# Altium PCB NB2DSK01.PcbDoc (part 9 of 17)
Units mil, origin at the board's own origin, x right, y up, seen from the top; angles counter-clockwise.
Board outline 11815 x 6500.03 mil, 8 copper layers (Top Layer, MidLayer1, MidLayer2, GND, PWR, MidLayer3, MidLayer4, Bottom Layer), stack 74.62 mil thick; 798 components, 1002 nets, 3927 pads, 3182 vias.
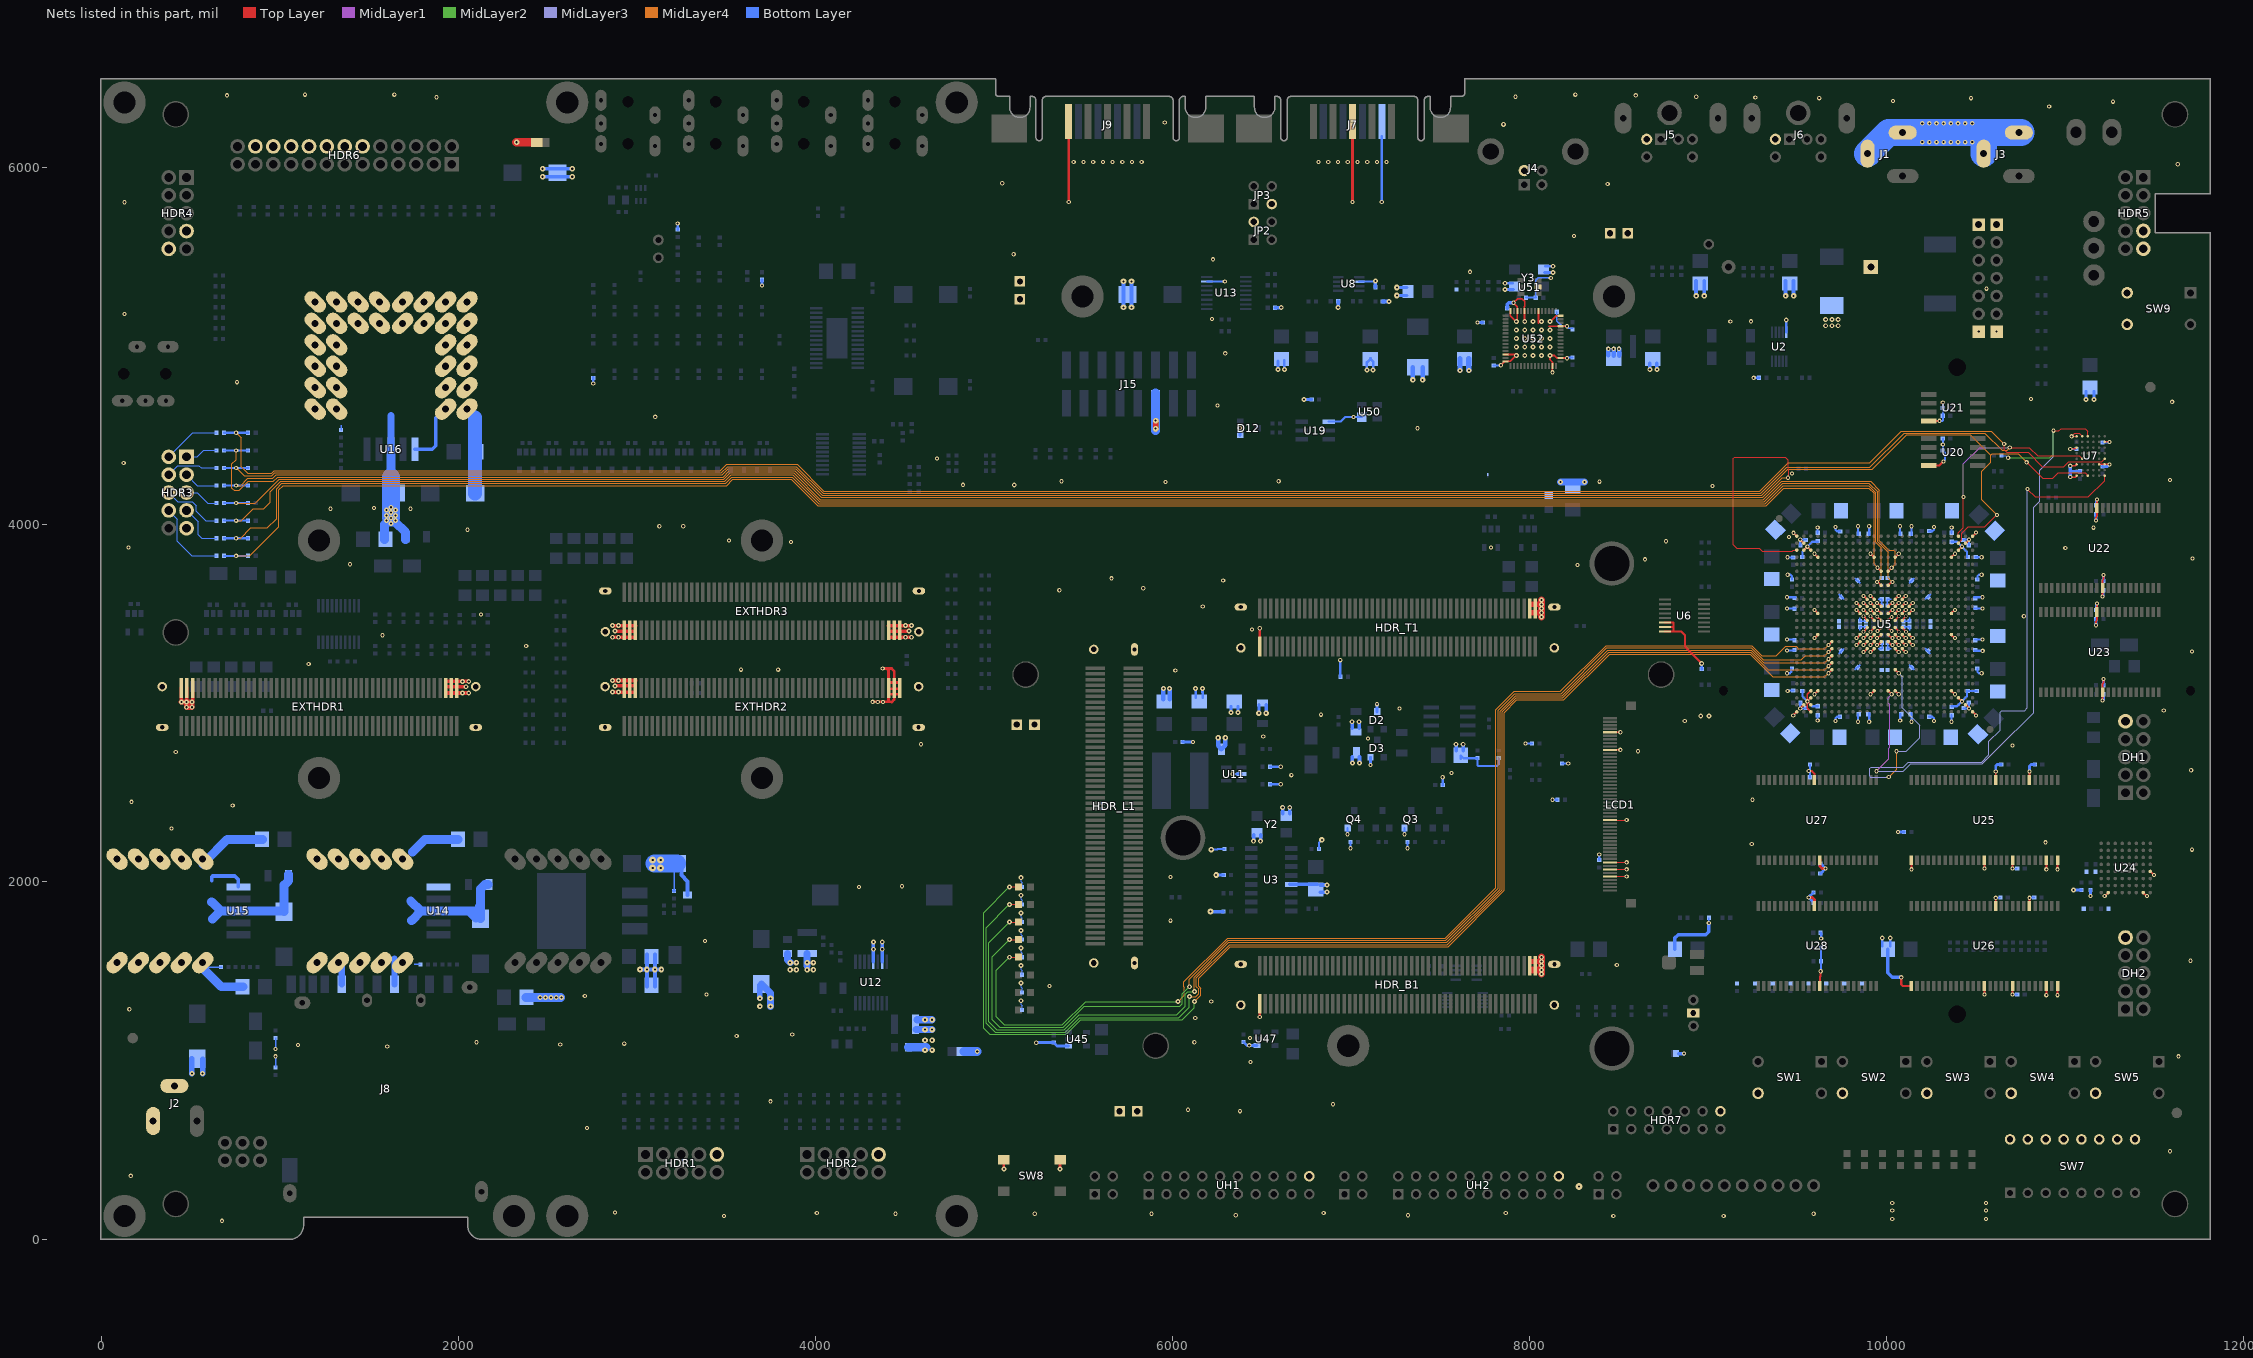
[diagram p15: the nets of this part, all layers, seen from the top]

## Via types
v1: diameter 23.62, hole 11.81, Top Layer to Bottom Layer, tented both sides, 1950 vias
v2: diameter 27.56, hole 11.81, Top Layer to Bottom Layer, tented both sides, 679 vias
v3: diameter 23.62, hole 11.81, Top Layer to Bottom Layer, 194 vias
v4: diameter 31.5, hole 11.81, Top Layer to Bottom Layer, tented both sides, 178 vias
v5: diameter 21.65, hole 11.81, Top Layer to Bottom Layer, tented both sides, 67 vias
v6: diameter 23.62, hole 11.81, Top Layer to Bottom Layer, tented bottom, 53 vias
v7: diameter 26, hole 11.81, Top Layer to Bottom Layer, tented both sides, 21 vias
v8: diameter 26, hole 11.81, Top Layer to Bottom Layer, 13 vias
v9: diameter 28, hole 11.81, Top Layer to Bottom Layer, 8 vias
v10: diameter 25.59, hole 11.81, Top Layer to Bottom Layer, tented both sides, 7 vias
v11: diameter 39.37, hole 11.81, Top Layer to Bottom Layer, tented both sides, 5 vias
v12: diameter 30, hole 11.81, Top Layer to Bottom Layer, 3 vias
v13: diameter 30, hole 11.81, Top Layer to Bottom Layer, tented both sides, 2 vias
v14: diameter 23, hole 11.81, Top Layer to Bottom Layer, tented both sides, 1 vias
v15: diameter 26.56, hole 11.81, Top Layer to Bottom Layer, tented both sides, 1 vias

## Nets (pads, with @x,y where several pads share a name; then routed paths per layer and width w, separated by ;. In a path a pad name is that pad's centre, name@x,y a point inside that pad or via, vN(x,y) a via of type N, cw(c..) or ccw(c..) an arc to the next point about the centre after c; other vN are vias at no path point) (continued)
GND: BT1.2 C1.2 C2.2 C3.2 C4.2 C10.2 C11.2 C12.2 C13.2 C14.2 C15.2 C18.2 C19.2 C20.2 C21.2 C22.2 C23.2 C24.2 C25.2 C26.2 C27.2 C28.2 C29.2 C30.2 C31.2 C32.2 C33.2 C34.2 C35.2 C36.2 C37.2 C38.2 C39.2 C40.2 C41.2 C42.2 C43.2 C44.2 C45.2 C46.2 C47.2 C48.2 C49.2 C50.2 C51.2 C52.2 C53.2 C54.2 C55.2 C56.2 C57.2 C58.2 C59.2 C60.2 C61.2 C62.2 C63.2 C64.2 C65.2 C66.2 C67.2 C68.2 C69.2 C70.2 C71.2 C72.2 C73.2 C74.2 C75.2 C76.2 C77.2 C78.2 C79.2 C80.2 C81.2 C82.2 C83.2 C84.2 C85.2 C86.2 C87.2 C88.2 C89.2 C90.2 C91.2 C92.2 C93.2 C94.2 C95.2 C96.2 C97.2 C98.2 C99.2 C100.2 C101.2 C102.2 C103.2 C104.2 C105.2 C106.2 C107.2 C108.2 C109.2 C110.2 C111.2 C112.2 C113.2 C114.2 C115.2 C116.2 C117.2 C118.2 C119.1 C120.2 C121.2 C122.2 C123.2 C124.2 C125.2 C126.2 C127.2 C128.2 C129.1 C130.2 C132.2 C133.2 C134.2 C135.2 C136.2 C137.2 C138.1 C139.1 C140.2 C141.2 C142.1 C143.2 C144.1 C146.1 C147.1 C148.1 C149.1 C150.2 C156.2 C157.2 C158.2 C159.2 C160.2 C161.2 C162.2 C163.2 C164.2 C165.2 C166.2 C167.2 C168.2 C169.2 C170.2 C172.2 C181.2 C189.2 C199.2 C200.1 C201.2 C202.1 C203.2 C204.2 C205.2 C206.2 C207.2 C208.2 C209.2 C210.2 C211.2 C212.2 C213.2 C214.2 C215.2 C216.2 C217.2 C218.2 C219.2 C220.2 C221.2 C222.2 C223.2 C224.2 C225.2 C226.2 C227.2 C228.2 C229.2 C230.2 C231.2 C232.2 C233.2 C234.2 C251.2 C253.2 C263.1 C264.1 C265.1 C266.2 C267.2 C268.2 C269.2 C270.2 C271.2 C272.1 C273.2 D1.1 D2.2 D3.2 D12.1 DH1.9 DH2.9 EXTHDR1.1 EXTHDR1.3 EXTHDR1.5 EXTHDR1.95 EXTHDR1.97 EXTHDR1.99 EXTHDR1.MH1 EXTHDR1.MH2 EXTHDR1.MH3 EXTHDR1.MH4 EXTHDR2.1 EXTHDR2.3 EXTHDR2.5 EXTHDR2.95 EXTHDR2.97 EXTHDR2.99 EXTHDR2.MH1 EXTHDR2.MH2 EXTHDR2.MH3 EXTHDR2.MH4 EXTHDR3.1 EXTHDR3.3 EXTHDR3.5 EXTHDR3.95 EXTHDR3.97 EXTHDR3.99 EXTHDR3.MH1 EXTHDR3.MH2 EXTHDR3.MH3 EXTHDR3.MH4 GP1.1 GP1.2 GP2.1 GP2.2 GP3.1 GP3.2 GP4.1 GP4.2 HDR1.9 HDR2.9 HDR3.9 HDR4.7 HDR4.10 HDR5.7 HDR5.9 HDR6.19 HDR6.20 HDR6.21 HDR6.22 HDR6.23 HDR6.24 HDR6.25 HDR7.14 HDR_B1.1 HDR_B1.98 HDR_B1.100 HDR_B1.MH1 HDR_B1.MH2 HDR_B1.MH3 HDR_B1.MH4 HDR_L1.MH1 HDR_L1.MH2 HDR_L1.MH3 HDR_L1.MH4 HDR_T1.1 HDR_T1.98 HDR_T1.100 HDR_T1.MH1 HDR_T1.MH2 HDR_T1.MH3 HDR_T1.MH4 J1.2 J1.3 J2.2 J2.3 J3.2 J3.3 J4.4 J5.3 J6.3 J7.3 J7.6 J8.3 J8.6 J9.5 J15.5 JP2.2 JP3.3 LCD1.5 LCD1.7 LCD1.9 LCD1.21 LCD1.41 LCD1.46 NT1.2 NT2.1 NT4.2 NT6.1 pad.0@88.68,1548.45 pad.0@88.68,2128.45 pad.0@208.68,1548.45 pad.0@208.68,2128.45 pad.0@328.68,1548.45 pad.0@328.68,2128.45 pad.0@448.68,1548.45 pad.0@448.68,2128.45 pad.0@568.68,1548.45 pad.0@568.68,2128.45 pad.0@1198.68,4648.45 pad.0@1198.68,4768.45 pad.0@1198.68,4888.45 pad.0@1198.68,5008.45 pad.0@1198.68,5128.45 pad.0@1198.68,5248.45 pad.0@1208.68,1548.45 pad.0@1208.68,2128.45 pad.0@1318.68,4648.45 pad.0@1318.68,4768.45 pad.0@1318.68,4888.45 pad.0@1318.68,5008.45 pad.0@1318.68,5128.45 pad.0@1318.68,5248.45 pad.0@1328.68,1548.45 pad.0@1328.68,2128.45 pad.0@1438.68,5128.45 pad.0@1438.68,5248.45 pad.0@1448.68,1548.45 pad.0@1448.68,2128.45 pad.0@1558.68,5128.45 pad.0@1558.68,5248.45 pad.0@1568.68,1548.45 pad.0@1568.68,2128.45 pad.0@1688.68,1548.45 pad.0@1688.68,2128.45 pad.0@1688.68,5128.45 pad.0@1688.68,5248.45 pad.0@1808.68,5128.45 pad.0@1808.68,5248.45 pad.0@1928.68,4648.45 pad.0@1928.68,4768.45 pad.0@1928.68,4888.45 pad.0@1928.68,5008.45 pad.0@1928.68,5128.45 pad.0@1928.68,5248.45 pad.0@2048.68,4648.45 pad.0@2048.68,4768.45 pad.0@2048.68,4888.45 pad.0@2048.68,5008.45 pad.0@2048.68,5128.45 pad.0@2048.68,5248.45 pad.0@8916.89,1266.02 pad.0@10514.96,5081.98 pad.0@10514.96,5681.95 pad.0@10614.96,5081.98 pad.0@10614.96,5681.95 Q3.2 Q4.2 R5.2 R19.2 R42.1 R44.1 R50.1 R51.1 R55.1 R58.1 R59.1 R62.2 R64.1 R65.1 R75.1 R78.2 R81.1 R82.1 R83.1 R92.1 R93.1 R94.1 R95.1 R96.1 R97.1 R98.1 R99.1 R100.1 R101.1 R102.1 R103.1 R104.1 R105.1 R106.1 R107.1 R312.2 R317.2 SW1.4 SW2.4 SW3.4 SW4.4 SW5.4 SW7.9 SW7.10 SW7.11 SW7.12 SW7.13 SW7.14 SW7.15 SW7.16 SW8.3 SW8.4 SW9.3 SW9.4 U2.5 U3.5 U5.A1 U5.A26 U5.AC3 U5.AC4 U5.AC12 U5.AC15 U5.AC23 U5.AD3 U5.AD24 U5.AE2 U5.AE3 U5.AE25 U5.AF1 U5.AF3 U5.AF26 U5.B2 U5.B25 U5.C2 U5.C3 U5.C24 U5.D4 U5.D12 U5.D15 U5.D23 U5.K11 U5.K12 U5.K15 U5.K16 U5.L10 U5.L11 U5.L12 U5.L13 U5.L14 U5.L15 U5.L16 U5.L17 U5.M4 U5.M10 U5.M11 U5.M12 U5.M13 U5.M14 U5.M15 U5.M16 U5.M17 U5.M23 U5.N11 U5.N12 U5.N13 U5.N14 U5.N15 U5.N16 U5.P11 U5.P12 U5.P13 U5.P14 U5.P15 U5.P16 U5.R4 U5.R10 U5.R11 U5.R12 U5.R13 U5.R14 U5.R15 U5.R16 U5.R17 U5.R23 U5.T10 U5.T11 U5.T12 U5.T13 U5.T14 U5.T15 U5.T16 U5.T17 U5.U11 U5.U12 U5.U15 U5.U16 U6.6 U6.7 U6.8 U7.A1 U7.A2 U7.B6 U7.C1 U7.F1 U7.F5 U7.F6 U7.H1 U8.2 U11.2 U12.13 U12.15 U13.15 U14.1 U14.3 U15.1 U15.3 U16.1 U16.3 U19.1 U20.4 U21.4 U22.12 U22.34 U23.12 U23.34 U24.E8 U24.H2 U24.H7 U25.6 U25.12 U25.28 U25.41 U25.46 U25.52 U25.54 U26.6 U26.12 U26.28 U26.41 U26.46 U26.52 U26.54 U27.12 U27.34 U28.12 U28.34 U45.1 U47.1 U50.1 U51.2 U52.6 U52.10 U52.12 U52.14 U52.26 U52.28 U52.41 U52.44 U52.53 U52.56 UH1.20 UH2.20 Y2.2 Y2.4 Y3.2 Y3.4 | length 31327.7
  Top Layer w5: LCD1.5@8448.82,2031.5 v1(8543.31,2031.5) ; LCD1.7@8448.82,2070.87 v1(8543.31,2070.87) ; LCD1.9@8448.82,2110.24 v1(8543.31,2110.24) ; LCD1.21@8448.82,2346.46 v1(8543.31,2346.46) ; U7.A1@11062.99,4496.06 v1(11035.43,4496.06) 11052.99,4513.62 11076.93,4513.62 U7.A2@11094.49,4496.06
  Top Layer w7.87: v1(7838.58,4893.7) v1(7838.58,4893.7) U52.28@7860.24,4915.35 ; U52.12@7931.1,5201.38 7931.1,5222.44 v1(7909.45,5244.09) 7933.07,5267.72 7956.69,5267.72 7972.44,5251.97 7972.44,5224.41 7970.47,5222.44 U52.10@7970.47,5197.78 U52.10@7970.47,5193.9 ; v1(8127.95,4854.33) U52.41@8127.95,4885.24 ; U52.53@8177.76,5112.2 v1(8208.68,5112.2) ; LCD1.41@8448.82,2740.16 v1(8507.87,2740.16) ; LCD1.46@8448.82,2838.58 v1(8507.87,2838.58) ; v1(9476.38,2933.07) U5.AF1@9496.06,2952.76 ; v1@9476.38,3956.7 v1(9477.68,3955.5) U5.A1@9496.06,3937.01 ; v1(9515.75,2972.44) U5.AE2@9535.43,2992.13 ; v1(9515.75,3917.32) U5.B2@9535.43,3897.64 ; U5.C2@9535.43,3858.27 v1(9555.12,3877.95) U5.C3@9574.8,3858.27 ; U5.AF3@9574.8,2952.76 9555.12,2972.44 v1(9555.12,3011.81) ; U5.AD3@9574.8,3031.5 v1(9555.12,3011.81) ; U5.AC3@9574.8,3070.87 9555.12,3051.18 v1(9555.12,3011.81) ; v1(9594.49,3051.18) U5.AC4@9614.17,3070.87 ; v1(9594.49,3366.14) U5.R4@9614.17,3385.83 ; v1(9594.49,3523.62) U5.M4@9614.17,3503.94 ; v1(9594.49,3838.58) U5.D4@9614.17,3818.9 ; v1(9830.71,3326.77) U5.T10@9850.39,3346.46 ; v1(9830.71,3366.14) U5.R10@9850.39,3385.83 ; v1(9830.71,3523.62) U5.M10@9850.39,3503.94 ; v1(9830.71,3562.99) U5.L10@9850.39,3543.31 ; v1(9870.08,3287.4) U5.U11@9889.76,3307.09 ; v1(9870.08,3326.77) U5.T11@9889.76,3346.46 ; v1(9870.08,3366.14) U5.R11@9889.76,3385.83 ; v5@9870.08,3402.76 U5.P11@9889.76,3425.2 ; v5@9870.08,3487.01 U5.N11@9889.76,3464.57 ; v1(9870.08,3523.62) U5.M11@9889.76,3503.94 ; v1(9870.08,3562.99) U5.L11@9889.76,3543.31 ; v1(9870.08,3602.36) U5.K11@9889.76,3582.68 ; v1(9909.45,3051.18) U5.AC12@9929.13,3070.87 ; v1(9909.45,3287.4) U5.U12@9929.13,3307.09 ; v1(9909.45,3326.77) U5.T12@9929.13,3346.46 ; v1(9909.45,3366.14) U5.R12@9929.13,3385.83 ; v5@9909.45,3403.15 U5.P12@9929.13,3425.2 ; v5@9909.45,3486.62 U5.N12@9929.13,3464.57 ; v1(9909.45,3523.62) U5.M12@9929.13,3503.94 ; v1(9909.45,3562.99) U5.L12@9929.13,3543.31 ; v1(9909.45,3602.36) U5.K12@9929.13,3582.68 ; v1(9909.45,3838.58) U5.D12@9929.13,3818.9 ; v5@9946.06,3562.99 U5.L13@9968.5,3543.31 ; v5@9946.46,3366.14 U5.R13@9968.5,3385.83 ; v5@9946.46,3523.62 U5.M13@9968.5,3503.94 ; v5(9946.85,3486.22) U5.N13@9968.5,3464.57 ; v5@9948.82,3326.77 U5.T13@9968.5,3346.46 ; v5(9948.82,3405.51) U5.P13@9968.5,3425.2 ; U5.T14@10007.87,3346.46 v5@10027.56,3326.77 ; U5.R14@10007.87,3385.83 v5@10029.92,3366.14 ; U5.P14@10007.87,3425.2 v5(10027.56,3405.51) ; U5.N14@10007.87,3464.57 v5(10027.56,3484.25) ; U5.M14@10007.87,3503.94 v5@10029.92,3523.62 ; U5.L14@10007.87,3543.31 v5@10030.32,3562.99 ; U5.AC15@10047.24,3070.87 v1(10066.93,3051.18) ; U5.U15@10047.24,3307.09 v1(10066.93,3287.4) ; U5.T15@10047.24,3346.46 v1(10066.93,3326.77) ; U5.R15@10047.24,3385.83 v1(10066.93,3366.14) ; U5.P15@10047.24,3425.2 v5@10066.93,3403.15 ; U5.N15@10047.24,3464.57 v5(10066.93,3488.19) ; U5.M15@10047.24,3503.94 v1(10066.93,3523.62) ; U5.L15@10047.24,3543.31 v1(10066.93,3562.99) ; U5.K15@10047.24,3582.68 v1(10066.93,3602.36) ; U5.D15@10047.24,3818.9 v1(10066.93,3838.58) ; U5.U16@10086.61,3307.09 v1(10106.3,3287.4) ; U5.T16@10086.61,3346.46 v1(10106.3,3326.77) ; U5.R16@10086.61,3385.83 v1(10106.3,3366.14) ; U5.P16@10086.61,3425.2 v5@10106.3,3405.51 ; U5.N16@10086.61,3464.57 v5@10106.3,3487.01 ; U5.M16@10086.61,3503.94 v1(10106.3,3523.62) ; U5.L16@10086.61,3543.31 v1(10106.3,3562.99) ; U5.K16@10086.61,3582.68 v1(10106.3,3602.36) ; U5.T17@10125.98,3346.46 v1(10145.67,3326.77) ; U5.R17@10125.98,3385.83 v1(10145.67,3366.14) ; U5.M17@10125.98,3503.94 v1(10145.67,3523.62) ; U5.L17@10125.98,3543.31 v1(10145.67,3562.99) ; U5.AC23@10362.2,3070.87 v1(10381.89,3051.18) ; U5.R23@10362.2,3385.83 v1(10381.89,3366.14) ; U5.M23@10362.2,3503.94 v1(10381.89,3523.62) ; U5.D23@10362.2,3818.9 v1(10381.89,3838.58) ; U5.AD24@10401.58,3031.5 v1(10421.26,3011.81) ; U5.C24@10401.58,3858.27 v1(10421.26,3877.95) ; U5.AE25@10440.95,2992.13 v1(10460.63,2972.44) ; U5.B25@10440.95,3897.64 v1(10460.63,3917.32) ; U5.AF26@10480.32,2952.76 v1(10500,2933.07) ; U5.A26@10480.32,3937.01 v1(10500,3956.7) ; v1(11027.56,4267.72) 11055.12,4267.72 U7.H1@11062.99,4275.59 ; v1(11027.56,4330.71) 11055.12,4330.71 U7.F1@11062.99,4338.58 ; v1(11027.56,4425.2) 11055.12,4425.2 U7.C1@11062.99,4433.07 ; U7.F5@11188.98,4338.58 U7.F6@11220.47,4338.58 v1(11248.03,4338.58) ; v1(11220.47,1921.08) U24.H2@11240.16,1940.77 ; U7.B6@11220.47,4464.57 v1(11248.03,4464.57) ; U24.H7@11437.01,1940.77 v1(11456.69,1921.08) ; U24.E8@11476.38,2058.88 v1(11496.06,2039.19)
  Top Layer w8: U52.28@7869.09,4915.35 7891.73,4915.35 v2@7925.2,4948.82 ; U52.14@7891.73,5193.9 7891.73,5171.26 7925.12,5137.87 v2@7925.2,5137.8 ; v2@8114.17,5137.8 8114.24,5137.87 8147.64,5171.26 U52.56@8170.28,5171.26
  Top Layer w9.84: U52.26@7861.61,4954.73 7865.35,4954.73 7925.19,4954.73 v2@7932.14,4954.73 ; v2@7931.1,5130.85 7931.1,5137.94 U52.12@7931.1,5197.78 U52.12@7931.1,5201.38 ; v2@7970.47,5130.85 7970.47,5137.94 U52.10@7970.47,5197.78 U52.10@7970.47,5201.38 ; 8049.21,5130.85 8049.21,5137.94 U52.6@8049.21,5197.78 U52.6@8049.21,5201.38 ; 8107.23,5112.21 8174.01,5112.21 U52.53@8177.76,5112.21 ; v1(10547.24,1370.08) U26.41@10547.25,1417.32 ; v1(10547.24,2074.8) U25.41@10547.25,2122.05 ; U26.12@10610.24,1866.14 v1(10610.24,1911.42) v1@10610.24,1915.36 ; U25.12@10610.24,2570.87 v1(10610.24,2618.11) ; v1(10704.72,1370.08) U26.46@10704.73,1417.32 ; v1(10704.72,2074.8) U25.46@10704.73,2122.05 ; U26.6@10799.21,1866.14 v1(10799.21,1911.42) v1@10799.21,1915.36 ; U25.6@10799.21,2570.87 v1(10799.21,2618.11) ; v1(11172.24,3437.99) 11172.24,3460.7 11177.17,3465.62 U23.34@11177.17,3511.81 v1(11177.17,3559.06) ; v1(11172.24,4024.61) 11172.24,4043.21 11177.17,4048.13 U22.34@11177.17,4094.49 v1(11177.17,4141.73) ; v1(11208.66,3015.75) U23.12@11208.66,3062.99 11208.66,3108.66 11213.58,3113.58 v1(11213.58,3136.81) ; v1(11208.66,3598.43) U22.12@11208.66,3645.67 11208.66,3690.2 11213.58,3695.13 v1(11213.58,3719.49)
  Top Layer w10: U52.41@8127.95,4892.72 8127.95,4910.69 8114.17,4924.47 8114.17,4948.82 8138.52,4948.82 8152.3,4935.04 U52.44@8170.28,4935.04 ; U52.44@8174.01,4935.19 v1@8206.95,4935.19
  Top Layer w11.81: v1(6488.19,1244.1) HDR_B1.1@6488.19,1318.9 ; HDR_T1.1@6488.19,3318.9 v1(6488.19,3421.26) ; v1(9562.99,2622.05) 9578.74,2622.05 9594.49,2606.3 U27.12@9594.49,2574.8 ; U28.34@9625.98,1417.32 9625.98,1467.98 9629.92,1471.92 v1(9629.92,1500.14) ; v1(10081,1466) 10081,1426 10089.68,1417.32 U26.28@10137.8,1417.32 ; v1(10137.8,2070.87) U25.28@10137.8,2122.05 ; U20.4@10234.25,4333.07 10295.07,4333.07 v1(10317,4355) ; U21.4@10234.25,4581.1 U21.4@10235.83,4582.68 ; v1(10893.7,1366.14) U26.52@10893.7,1417.32 ; v1(10893.7,2070.87) U25.52@10893.7,2122.05 ; v1(10956.69,1366.14) U26.54@10956.69,1417.32 ; v1(10956.69,2070.87) U25.54@10956.69,2122.05
  Top Layer w12: U6.8@8757.87,3401.93 8805.12,3401.93 ; U6.7@8757.87,3427.52 8803.15,3427.52 8805.12,3429.49 ; U6.6@8757.87,3453.11 8805.12,3453.11 8805.12,3429.49 ; v2(8963.58,3223.58) 8870.24,3316.93 8870.24,3381.69 8850,3401.93 8805.12,3401.93 ; v1(9555.12,3011.81) U5.AE3@9574.8,2992.13 ; U21.4@10235.83,4582.68 v1(10295.28,4582.68) ; 8805.12,3401.93 8805.12,3429.49
  Top Layer w15: v1(4320.6,3008.98) v1@4348.97,3008.98 ; v1(4349.37,3008.58) v1(4377.73,3008.58) 4403.34,3008.58 ; v1(4376.55,3195.34) 4399.15,3195.34 ; 4426.98,3008.58 4403.34,3008.58 ; 4427.77,3007.8 4440.95,3020.97 EXTHDR2.3@4440.95,3051.18 ; EXTHDR2.1@4472.44,3051.18 EXTHDR2.3@4440.95,3051.18 ; EXTHDR2.1@4472.44,3082.68 EXTHDR2.3@4440.95,3082.68 ; 4399.15,3195.34 4409.45,3185.04 4409.45,3118.11 EXTHDR2.5@4409.45,3086.61 EXTHDR2.5@4409.45,3082.68 ; 4399.15,3195.34 4426.71,3195.34 4440.95,3181.1 4440.95,3118.11 EXTHDR2.3@4440.95,3086.61 EXTHDR2.3@4440.95,3082.68 ; 4403.34,3008.58 4409.45,3014.69 EXTHDR2.5@4409.45,3051.18 ; EXTHDR2.5@4409.45,3051.18 EXTHDR2.5@4409.45,3082.68 ; EXTHDR2.5@4409.45,3051.18 EXTHDR2.3@4440.95,3051.18 ; EXTHDR2.5@4409.45,3082.68 EXTHDR2.3@4440.95,3082.68 ; EXTHDR2.3@4440.95,3051.18 EXTHDR2.3@4440.95,3082.68
  Top Layer w15.75: EXTHDR2.5@4409.45,3118.11 4440.95,3118.11 EXTHDR2.1@4472.44,3118.11 ; v2(5055.12,392.91) SW8.4@5055.12,444.49 SW8.4@5059.06,448.43 ; v2(5370.47,392.91) SW8.3@5370.47,444.49 ; J9.5@5418.28,6258.86 v1(5418.57,5807.92) ; v1(7007.89,5808.9) J7.3@7008,6259.84 ; v1(9562.99,1913.39) 9582.68,1913.39 9594.49,1901.58 U28.12@9594.49,1866.14 ; U27.34@9625.98,2122.05 9625.98,2086.62 9637.8,2074.8 v1(9657.48,2074.8)
  Top Layer w19.68: v2@448.82,3008.58 EXTHDR1.99@448.82,3086.61 ; v2@480.32,3010.08 EXTHDR1.97@480.31,3086.61 ; v2@511.81,3011.57 EXTHDR1.95@511.81,3086.61 ; EXTHDR1.5@1929.13,3123.45 1960.63,3123.45 1992.13,3123.45 v2(2023.68,3123.45) v2(2058.68,3123.45) ; EXTHDR1.5@1929.74,3058.45 1960.63,3058.45 1992.13,3058.45 v2(2023.68,3058.45) v2(2058.68,3058.45) ; EXTHDR1.5@1930.17,3093.45 1960.63,3093.45 1992.13,3093.45 v2(2043.68,3093.45) ; v2(2862.95,3063.43) v2(2897.95,3063.43) 2929.13,3063.43 2960.63,3063.43 EXTHDR2.95@2991.9,3063.43 ; v2(2862.95,3128.43) v2(2897.95,3128.43) 2929.13,3128.43 2960.63,3128.43 2992.13,3128.43 EXTHDR2.95@2992.5,3128.43 ; v2(2862.95,3370.51) v2(2897.95,3370.51) 2929.13,3370.51 2960.63,3370.51 EXTHDR3.5@2991.9,3370.51 ; v2(2862.95,3435.51) v2(2897.95,3435.51) 2929.13,3435.51 2960.63,3435.51 2992.13,3435.51 EXTHDR3.5@2992.5,3435.51 ; v2(2877.95,3098.43) 2929.13,3098.43 2960.63,3098.43 EXTHDR2.95@2991.47,3098.43 ; v2(2877.95,3405.51) 2929.13,3405.51 2960.63,3405.51 EXTHDR3.5@2991.47,3405.51 ; EXTHDR3.95@4409.07,3435.51 4409.45,3435.51 4440.95,3435.51 4472.44,3435.51 v2(4503.62,3435.51) v2(4538.62,3435.51) ; EXTHDR3.95@4409.68,3370.51 4440.95,3370.51 4472.44,3370.51 v2(4503.62,3370.51) v2(4538.62,3370.51) ; EXTHDR3.95@4410.11,3405.51 4440.95,3405.51 4472.44,3405.51 v2(4523.62,3405.51)
  Top Layer w29.53: HDR_B1.98@8007.87,1555.12 8031.5,1555.12 v2(8066.93,1555.12) ; HDR_T1.98@8007.87,3555.12 8031.5,3555.12 v2(8066.93,3555.12) ; 8011.81,3507.87 8031.5,3507.87 v2(8066.93,3507.87)
  Top Layer w30: v2(448.68,3008.45) v2(478.68,3008.45) ; v4(5905.51,4538.77) v4(5905.51,4583.68) ; v2(478.68,3008.45) v2(478.68,2978.45) v2(508.68,2978.45) v2(508.68,3008.45) v2(478.68,3008.45)
  Top Layer w39.37: 8011.81,1507.87 8031.5,1507.87 v2(8066.93,1507.87) ; v2(8066.93,1484.25) v2(8066.93,1507.87) ; v2(8066.93,1578.74) v2(8066.93,1555.12) v2(8066.93,1531.5) v2(8066.93,1507.87) ; v2(8066.93,3484.25) v2(8066.93,3507.87) v2(8066.93,3531.5) v2(8066.93,3555.12) v2(8066.93,3578.74)
  Top Layer w50: v4@2324.81,6142.82 v4(2326.58,6142.82) NT4.2@2409.4,6142.8
  MidLayer1 w30: v4(5905.51,4538.77) v4(5905.51,4583.68)
  MidLayer2 w30: v4(5905.51,4538.77) v4(5905.51,4583.68)
  MidLayer4 w30: v4(5905.51,4538.77) v4(5905.51,4583.68)
  MidLayer3 w30: v4(5905.51,4538.77) v4(5905.51,4583.68)
  Bottom Layer w5: HDR4.7@477.95,5644.88 HDR4.7@477.95,5645.67 ; v2(5151.97,1335.04) 5151.97,1311.76 5157.17,1306.56 R99.1@5157.17,1283.47 ; v2(5151.97,1433.47) 5151.97,1410.18 5157.17,1404.98 R98.1@5157.17,1381.89 ; v2(5151.97,1531.89) 5151.97,1508.61 5157.17,1503.41 R97.1@5157.17,1480.32 ; v2(5151.97,1630.32) 5151.97,1607.03 5157.17,1601.83 R96.1@5157.17,1578.74 ; v2(5151.97,1728.74) 5151.97,1705.46 5157.17,1700.26 R95.1@5157.17,1677.17 ; v2(5151.97,1827.17) 5151.97,1803.88 5157.17,1798.68 R94.1@5157.17,1775.59 ; v2(5151.97,1925.59) 5151.97,1902.31 5157.17,1897.11 R93.1@5157.17,1874.02 ; v2(5151.97,2024.02) 5151.97,2000.73 5157.17,1995.53 R92.1@5157.17,1972.44
  Bottom Layer w7.87: C269.2@8034.45,5272.46 8034.45,5370.49 8047.05,5383.09 v1(8118.5,5383.09) ; v1(9003.45,1770.36) R42.1@9003.45,1799.21 ; v1@9547.25,3877.95 v1(9555.12,3877.95) v1@9555.12,3885.83 ; 9732.28,3279.53 9745.23,3292.47 C32.2@9745.23,3294.14 9746.9,3294.14 9759.84,3307.09 ; 9732.28,3610.24 9745.23,3597.29 C29.2@9745.23,3595.62 9746.9,3595.62 9759.84,3582.68 ; C52.2@9736.22,2925.2 9738.46,2925.2 9740.16,2925.2 C52.2@9739.61,2924.65 ; 9821.96,3188.11 9835.78,3201.92 C27.2@9837.45,3201.92 9837.45,3203.59 9851.26,3217.4 ; 9822.83,3700.79 9835.78,3687.84 C31.2@9837.45,3687.84 9837.45,3686.17 9850.39,3673.23 ; 9849.41,3410.43 C85.2@9849.41,3429.14 ; C85.2@9849.41,3429.14 C107.2@9883.2,3429.45 ; 9849.41,3479.33 C105.2@9849.41,3460.63 C64.2@9883.2,3460.45 ; 9951.28,3306.1 C100.2@9972.44,3306.1 ; 9951.28,3583.66 C86.2@9972.44,3583.66 C92.2@9972.68,3548.93 ; C100.2@9971.46,3308.07 C100.2@9971.95,3307.58 ; C100.2@9973.44,3305.24 9973.45,3306.1 C62.2@9973.68,3339.97 ; C93.2@10003.68,3548.93 C94.2@10003.68,3583.42 ; C104.2@10003.94,3306.1 C104.2@10004.68,3306.1 ; C94.2@10003.94,3582.68 C94.2@10004.92,3581.69 ; C94.2@10003.94,3583.66 10025.1,3583.66 ; C104.2@10004.68,3305.49 C104.2@10004.68,3306.1 ; C110.2@10004.68,3339.97 C104.2@10004.68,3306.1 ; 10025.1,3306.1 C104.2@10004.68,3306.1 ; C63.2@10093.16,3429.45 C95.2@10127.95,3429.13 10127.95,3419.29 10127.95,3411.42 10125.98,3409.45 ; C96.2@10093.16,3460.45 C91.2@10127.95,3460.63 10127.95,3470.47 10127.95,3478.35 10125.98,3480.32 ; 10125.12,3217.4 10138.93,3203.59 C30.2@10138.93,3201.92 10140.6,3201.92 10153.54,3188.98 ; C95.2@10125.49,3428.64 C95.2@10125.98,3429.13 ; 10125.98,3673.23 10138.93,3686.17 C33.2@10138.93,3687.84 10140.6,3687.84 10153.54,3700.79 ; 10215.66,3307.96 10230.31,3293.31 C26.2@10231.15,3292.47 ; 10216.54,3582.68 10229.48,3595.62 C28.2@10231.15,3595.62 10231.15,3597.29 10246.6,3612.75 ; C26.2@10231.15,3294.14 C26.2@10231.15,3292.47 ; C26.2@10235.63,3299.21 C26.2@10236.22,3299.21 ; 10244.09,3279.53 C26.2@10231.15,3292.47
  Bottom Layer w8: pad.0@573.68,1523.45 R78.2@670.92,1523.45 R78.2@677.5,1523.45 ; R83.1@976.38,962.13 v1(976.38,1023.62) ; v1(976.38,1064.96) R82.1@976.38,1126.46 ; R81.1@1343.68,4531.03 1343.68,4558.45 ; 1753.68,1538.45 R75.1@1787.5,1538.45 ; R62.2@3208.68,1950.83 C137.2@3208.68,2098.45
  Bottom Layer w9.84: C272.1@8152.02,5193.1 8152.02,5141.98 8181.8,5112.2 v1(8208.68,5112.2) 8219.51,5101.38 C265.1@8240.16,5101.38 ; v1(10610.24,1911.42) C221.2@10635.82,1911.42 ; v1(10704.72,1370.08) C222.2@10731.3,1370.08 ; v1(10704.72,2074.8) C220.2@10728.35,2074.8 ; v1@10799.21,1913.39 C225.2@10825.79,1913.39
  Bottom Layer w10: v1(8208.68,4933.45) 8213.22,4937.99 C264.1@8240.16,4937.99
  Bottom Layer w11.81: v4@6220.47,2185.04 v4(6216.54,2181.1) 6248.84,2181.1 6252.78,2185.04 C13.2@6290.36,2185.04 ; v1(6336.61,2604.33) U11.2@6385.83,2604.33 ; C12.2@6819.88,2185.04 6819.88,2219.49 v4(6836.62,2236.22) ; v1(6980.64,2267.47) Q4.2@6980.64,2302.43 ; v1(6996.86,2188.73) R51.1@6996.86,2223.69 ; v1(7013,4604) U50.1@7060.24,4604 ; v1(7299.53,2267.47) Q3.2@7299.53,2302.43 ; v1(7315.75,2188.73) R50.1@7315.75,2223.69 ; C268.2@7799.21,4892.72 7837.6,4892.72 v1(7838.58,4893.7) ; v1(7977.32,2775.59) R44.1@8012.28,2775.59 ; v1(8127.95,2460.63) C118.2@8156.5,2460.63 ; C115.2@8181.1,2662.97 v1(8216.06,2662.97) ; C129.1@8389.76,2123.03 v1(8389.76,2153.54) ; C232.2@9569.88,2586.61 9569.88,2615.16 v1(9562.99,2622.05) 9569.88,2628.94 C228.2@9569.88,2657.48 ; v1@9630.91,1499.16 v1(9629.92,1500.14) 9630.91,1501.13 C229.2@9630.91,1556.18 C233.2@9630.91,1631.93 ; v1(10075,2905) 10075.39,2905.39 10075.39,2939.78 C71.2@10075.39,2939.96 ; v1(10295.28,4582.68) 10311.68,4582.68 10316,4587 10316,4609.41 C200.1@10313.96,4611.45 C201.2@10313.98,4654.74 v1(10313.98,4685.04) ; C202.1@10313.98,4484.25 v1(10313.98,4449.8) C199.2@10313.98,4417.32 10313.98,4417.16 10327,4404.14 10327,4365 v1(10317,4355) ; 11027.56,4299.21 11028.54,4300.2 ; v1(11027.56,4425.2) 11028.54,4424.21 C119.1@11062.99,4424.21 ; C208.2@11172.24,3523.62 11172.24,3554.13 v1(11177.17,3559.06) ; C207.2@11172.24,4110.24 11172.24,4132.87 11177.17,4137.8 v1(11177.17,4141.73) ; v1(11208.66,3598.43) 11213.58,3603.35 C204.2@11213.58,3633.86 ; C122.2@11208.66,4461.61 11245.08,4461.61 v1(11248.03,4464.57) ; v1@11246.06,4338.58 v1(11248.03,4338.58)
  Bottom Layer w12: U13.15@6192.59,5363.19 v1(6292.81,5363.19) ; U19.1@6874.27,4578.53 6942.53,4578.53 6968,4604 v1(7013,4604) ; R19.2@6939.43,3149.6 v1(6939.43,3242.47) ; U8.2@7045.11,5362.28 7133.41,5362.28 v2(7136.28,5365.15) ; C133.2@7614.06,2689.57 C133.2@7614.06,2708.66 7629.33,2693.39 R58.1@7708.54,2693.39 7708.54,2651.62 ; 7710.09,2650.08 7817.08,2650.08 7826.65,2659.65 R59.1@7826.65,2693.39 ; C270.2@7980.28,5272.46 C269.2@8034.45,5272.46 ; U2.5@9437.03,5078.18 v2(9437.03,5146.8) ; v1(9440.95,3169.29) 9456.65,3169.29 9465.16,3177.8 C40.2@9465.16,3195.16 ; v1(9440.95,3295.87) 9483.01,3295.87 C113.2@9483.27,3295.87 ; v1(9440.95,3357.68) 9483.01,3357.68 C72.2@9483.27,3357.68 ; v1(9440.95,3531.5) 9483.27,3531.5 C77.2@9488.19,3531.5 ; v1(9440.95,3594.49) 9483.27,3594.49 C109.2@9488.19,3594.49 ; v1(9444.88,3720.47) 9460.59,3720.47 9469.09,3711.97 C44.2@9469.09,3694.61 ; v1@9447.73,3071.69 C75.2@9476.76,3071.69 ; v1@9447.72,3818.08 C106.2@9476.76,3818.08 ; C47.2@9515.75,3003.94 9515.75,3003.35 v1(9515.75,2972.44) C50.2@9547.24,2972.44 ; C53.2@9515.75,3885.83 v1(9515.75,3917.32) 9546.65,3917.32 C45.2@9547.24,3917.32 ; C98.2@9527.56,3070.87 9527.56,3069.17 9527.56,3039.37 v1(9555.12,3011.81) 9582.68,2984.25 9612.87,2984.25 C81.2@9614.17,2984.25 ; C80.2@9527.56,3818.9 9527.56,3820.2 9527.56,3850.4 v1(9555.12,3877.95) 9582.68,3905.51 9613.01,3905.51 C78.2@9614.17,3905.51 ; v1(9613.03,2904.41) C99.2@9613.03,2933.45 ; C89.2@9613.03,3956.31 v1(9613.03,3985.35) ; v1(9712.6,2901.58) 9712.6,2917.28 9721.11,2925.79 C52.2@9738.46,2925.79 ; v1(9712.6,3988.19) 9712.6,3972.48 9721.11,3963.98 C41.2@9738.46,3963.98 ; v1(9838.58,2897.64) 9838.58,2939.78 C97.2@9838.58,2939.96 ; C112.2@9838.58,3944.88 9838.63,3950.16 v1(9838.98,3992.52) ; v1(9901.57,2897.64) 9901.58,2939.78 C76.2@9901.58,2944.88 ; C84.2@9901.58,3944.88 9901.58,3950.12 v1(9901.57,3992.13) ; C83.2@10074.8,3944.88 10074.8,3950.12 v1(10074.8,3992.13) ; v1(10137.8,2897.64) 10137.8,2939.78 C103.2@10137.8,2944.88 ; C111.2@10137.8,3944.88 10137.8,3950.12 v1(10137.8,3992.13) ; C42.2@10237.91,2925.79 10255.27,2925.79 10263.78,2917.28 v1(10263.78,2901.58) ; C38.2@10237.91,3963.98 10255.27,3963.98 10263.78,3972.48 v1(10263.78,3988.19) ; v1(10362.2,2897.64) C88.2@10362.21,2933.45 ; C70.2@10362.21,2984.25 10363.35,2984.25 10393.7,2984.25 v1(10421.26,3011.81) 10448.82,3039.37 10448.82,3069.78 C69.2@10448.82,3070.87 ; C79.2@10362.21,3905.51 10363.5,3905.51 10393.7,3905.51 v1(10421.26,3877.95) 10448.82,3850.4 10448.82,3820.12 C73.2@10448.82,3818.9 ; C87.2@10363.35,3956.31 v1(10363.35,3985.35) ; C43.2@10429.13,2972.44 10429.73,2972.44 v1(10460.63,2972.44) C48.2@10460.63,3003.94 ; C46.2@10429.13,3917.32 v1(10460.63,3917.32) 10460.63,3886.42 C49.2@10460.63,3885.83 ; C69.2@10453.78,3069.88 C108.2@10503.94,3069.88 ; C82.2@10488.19,3531.5 10496.35,3531.5 v1(10535.43,3531.5) ; C90.2@10488.19,3594.49 10495.35,3594.49 v1(10535.43,3594.49) ; C102.2@10493.11,3294.69 10495.35,3294.69 v1(10537.21,3294.69) ; C74.2@10493.68,3358.27 10495.35,3358.27 v1(10535.43,3358.27) ; C101.2@10498.68,3818.9 v1(10531.5,3818.9) ; C51.2@10507.28,3195.16 10507.28,3177.8 10515.79,3169.29 v1(10531.5,3169.29) ; C39.2@10507.28,3694.61 10507.28,3711.97 10515.79,3720.47 v1(10531.5,3720.47)
  Bottom Layer w15: C181.2@3228.68,5654.12 v1(3228.68,5688.45)
  Bottom Layer w15.75: v1(2755.91,4791.34) C172.2@2755.91,4821.85 C172.2@2755.91,4825.79 ; v1(3700.79,5341.34) C189.2@3700.79,5373.03 ; v1@5237.78,1100.78 C251.2@5334.73,1100.78 5353.43,1082.08 U45.1@5417.41,1082.08 ; C141.2@6055.12,2787.4 6057.58,2784.94 6059.06,2783.47 v1(6114.17,2783.47) ; C143.2@6129.92,3031.5 v2@6129.92,3083.45 ; v2(6168.68,3083.45) C143.2@6169.29,3031.5 ; v4(6244.09,2039.37) C14.2@6286.42,2039.37 ; v2(6326.77,2948.82) C132.2@6326.77,2984.25 ; v2(6366.14,2948.82) C132.2@6366.14,2984.25 ; D12.1@6378.66,4500.22 D12.1@6378.61,4504.6 v2(6378.66,4542.55) ; C253.2@6398.2,1103.8 6416.9,1085.1 v1(6429.69,1085.1) U47.1@6473,1085.1 ; R64.1@6546.77,2547.24 v1(6606.3,2547.24) ; R65.1@6546.77,2645.67 v1(6606.3,2645.67) ; v2(6590.61,4870.69) C123.2@6590.61,4917.94 ; v2(6626.05,4870.69) C123.2@6626.05,4921.87 ; v2@6733.08,4702 v2(6737.02,4702) C125.2@6779.34,4702 ; v2(7088.14,4866.76) 7088.14,4910.07 C124.2@7107.83,4929.75 ; C124.2@7107.83,4933.69 C124.2@7107.83,4929.75 ; v1(7108.27,2655.51) D3.2@7108.27,2698.82 ; v2(7123.57,4866.76) 7123.57,4914 C124.2@7107.83,4929.75 ; D2.2@7145.67,2952.76 D2.2@7145.67,2954.73 v1(7145.67,2996.06) ; J7.6@7171.46,6174.79 v1(7171.47,5808.9) ; C134.2@7512.8,2543.31 v1(7512.8,2586.61) ; v1(7708.66,5133.86) C267.2@7739.17,5133.86 ; v2(7861.93,5317.9) Y3.2@7909.17,5317.9 ; v2(7861.93,5353.34) Y3.2@7905.23,5353.34 ; Y3.4@8082.96,5412.9 v2(8130.2,5412.9) ; Y3.4@8086.89,5448.34 v2(8130.2,5448.34) ; C117.2@8963.58,3192.91 C117.2@8963.58,3194.31 ; v2(8963.58,3223.58) C117.2@8963.58,3194.31 ; C117.2@8964.96,3192.91 8965.35,3193.31 8964.18,3193.97 C117.2@8963.58,3194.31 ; v1(9254.55,4823.54) C11.2@9285.06,4823.54 ; C234.2@9589.57,1881.89 9589.57,1886.81 v1(9562.99,1913.39) 9562.99,1914.37 C230.2@9589.57,1940.95 ; C231.2@9626.97,2047.24 9629.92,2047.24 v1(9657.48,2074.8) 9629.92,2102.36 C227.2@9626.97,2102.36 ; C226.2@9629.62,1715.33 9632.57,1712.38 v1(9632.57,1683.84) ; C218.2@9974.58,1641.83 v2(9974.58,1686.83) ; C218.2@10019.58,1641.83 v2(10019.58,1686.83) ; v1(10063.1,2280.7) 10096.55,2280.7 C224.2@10097.55,2280.7 ; v1(10610.24,2618.11) 10610.24,2649.47 10618.25,2657.48 C219.2@10640.75,2657.48 ; v1(10799.21,2618.11) 10799.21,2649.47 10807.23,2657.48 C223.2@10829.72,2657.48 ; 11028.54,4300.2 C121.2@11082.68,4300.2 ; v2(11044.88,1955.53) C212.2@11090.55,1955.53 ; v2(11116,4703) C217.2@11116,4748 ; v1(11141.73,1921.08) C215.2@11141.73,1955.53 ; v2(11161,4703) C217.2@11161,4748 ; v1(11172.24,3437.99) C205.2@11172.24,3472.44 ; v1(11172.24,4024.61) C203.2@11172.24,4059.06 ; v1(11208.66,3015.75) 11213.58,3020.67 C206.2@11213.58,3051.18 ; C120.2@11208.66,4327.76 11235.24,4327.76 v1@11246.06,4338.58 ; C210.2@11213.58,3102.36 v1(11213.58,3136.81) ; C209.2@11213.58,3685.04 v1(11213.58,3719.49)
  Bottom Layer w17: v4(7256.38,5284.64) R317.2@7313.35,5284.64 ; v4(7256.38,5329.55) R317.2@7313.35,5329.55
  Bottom Layer w18: U12.15@4374.08,1553.55 v2(4374.08,1623.45) v2(4374.08,1663.05) ; v4(6483.45,2945.52) C139.1@6483.45,2994.77 ; v4(6524.43,2945.52) C139.1@6524.43,2994.77
  Bottom Layer w19.68: v4(6212.6,1834.65) R5.2@6282.91,1834.65 ; v2(6453.91,2228.46) Y2.2@6453.91,2263.89 ; v2(6493.28,2228.46) Y2.2@6493.28,2263.89 ; Y2.4@6616.95,2381.78 v2(6616.95,2417.21) ; U3.5@6655.51,1987.01 U3.5@6665.35,1987.01 6801.5,1987.01 C15.2@6810.24,1987.01 ; Y2.4@6656.32,2381.78 v2(6656.32,2417.21) ; C15.2@6828.7,1943.79 v2(6864.13,1943.79) ; C15.2@6828.7,1983.16 v2(6864.13,1983.16) ; 7005.92,2861.84 v2(7005.92,2897.28) ; v2(7007.72,2666.21) 7007.72,2701.64 ; 7045.29,2861.84 v2(7045.3,2897.28) ; v2(7047.09,2666.21) C130.2@7047.09,2701.64 ; C133.2@7588.48,2735.87 v2(7588.48,2771.3) ; C133.2@7627.85,2735.87 v2(7627.85,2771.3) ; v2(8672.83,4871.05) C10.2@8672.83,4906.48 ; v2(8712.2,4871.05) C10.2@8712.2,4906.48 ; v1(11027.56,4267.72) 11027.56,4299.21 v1@11027.56,4326.77
  Bottom Layer w20: 618.68,2008.45 618.68,2028.45 623.68,2033.45 748.68,2033.45 768.68,2013.45 U15.1@768.68,1972.31 ; U16.1@1757.54,4423.45 1853.68,4423.45 1873.68,4443.45 1873.68,4598.45 ; U12.13@4324.18,1553.45 v2(4324.18,1623.45) v2(4324.18,1662.95) ; C156.2@6574.48,5216.54 v2(6608.93,5216.54) ; v2(6927.83,5217.61) C127.2@6927.83,5252.06 ; R55.1@7136.28,5330.7 v2(7136.28,5365.15) ; C126.2@7177.41,5251.06 v2(7211.86,5251.06) ; C263.1@7874,5213.57 7874,5236 7882.09,5244.09 v1(7909.45,5244.09) ; C114.2@8813.31,1623 8813.31,1686.31 8832,1705 8987,1705 9003.45,1721.45 v1(9003.45,1770.36) ; 8836,1039 v1(8865,1039) ; C218.2@10005.89,1623 10005.89,1491.11 10031,1466 v1(10081,1466)
  Bottom Layer w22: v4(2471.99,5949.69) 2555.04,5949.69 v4(2638.13,5949.69) ; v4(2471.99,5994.61) 2555.04,5994.61 v4(2638.13,5994.61) ; v4(3017.28,1509.85) v4(3056.28,1509.85) ; C136.2@3056.28,1414.95 3056.28,1421.26 v4(3056.28,1509.85) ; C135.2@3056.28,1592.92 3056.28,1582.68 v4(3056.28,1509.85) ; C136.2@3101.2,1414.95 3101.2,1421.26 v4(3101.2,1509.85) ; C135.2@3101.2,1592.92 3101.2,1582.68 v4(3101.2,1509.85) ; v4(3137.28,1509.85) v4(3101.2,1509.85) ; C137.2@3224.6,2103.16 3249,2078.77 3249,2038 3283.56,2003.44 C138.1@3283.56,1927.18 ; v4(5725.12,5218) 5725.12,5290.81 v4(5725.12,5363.65) ; v4(5770.03,5218) 5770.03,5290.81 v4(5770.03,5363.65) ; v4(8932.79,5282.33) 8932.79,5351.22 C169.2@8932.79,5365.4 ; v4(8977.7,5282.33) 8977.7,5351.22 C169.2@8977.7,5365.4 ; v4(9433.72,5282.33) 9433.72,5351.22 C170.2@9433.72,5365.4 ; v4(9478.64,5282.33) 9478.64,5351.22 C170.2@9478.64,5365.4 ; v4(3056.28,1509.85) v4(3101.2,1509.85)
  Bottom Layer w23.62: v4(7345.88,4812) C271.2@7345.88,4882.87 ; v4(7401,4812) C271.2@7401,4882.87
  Bottom Layer w25: C116.2@5948.68,3023.45 v2(5948.68,3083.45) ; C116.2@5983.68,3023.45 v2(5983.68,3083.45) ; v4(6255.1,2808.03) 6255.1,2762.62 C144.1@6273.62,2744.1 6296.08,2766.55 v4(6296.08,2808.03) ; C273.2@8440.68,4951.08 v1(8440.68,4986.08) ; C273.2@8470.68,4946.08 v1(8470.68,4986.08) ; C273.2@8500.68,4946.08 v1(8500.68,4986.08)
  Bottom Layer w30: v2(507.93,926.74) 507.93,1010.84 C2.2@507.93,1011.74 ; v2(567.93,926.74) C2.2@567.93,1006.74 ; v4(3688.68,1348.45) C150.2@3688.68,1423.45 ; v2(7609.76,4864.63) C266.2@7609.76,4929.63 ; v2(7659.76,4864.63) C266.2@7659.76,4929.63
  Bottom Layer w35: J8.6@1347.22,1427.67 pad.0@1347.22,1547 ; J8.3@1642.5,1427.67 1642.5,1548.45 1642.5,1569.63
  Bottom Layer w39.37: C150.2@3696.85,1429.13 3748.68,1377.3 v4(3748.68,1348.45) v4(3748.68,1303.45) ; v2(8173.23,4240.16) 8240.16,4240.16 v2(8307.09,4240.16)
  Bottom Layer w40: U16.3@1623.68,4423.45 1623.68,4613.45 ; C148.1@3843.68,1599.08 3843.68,1563.45 v4(3858.68,1548.45) ; 3953.68,1529.8 v4(3953.68,1548.45) C149.1@3953.68,1599.4 ; C147.1@4563.68,1173.45 v4(4613.68,1173.45) v4(4653.68,1173.45) ; C147.1@4568.68,1228.45 v4(4613.68,1228.45) v4(4653.68,1228.45)
  Bottom Layer w50: pad.0@569.21,1517.09 672.85,1413.45 C163.2@790.69,1413.45 C163.2@794.63,1413.45 ; pad.0@569.21,2101.81 582.27,2114.87 705.85,2238.45 C162.2@900.69,2238.45 C162.2@904.63,2238.45 ; 618.68,1888.45 668.68,1838.45 ; 623.68,1793.45 668.68,1838.45 ; C164.2@1023.49,1838.45 U15.3@768.68,1838.45 668.68,1838.45 ; C164.2@1023.97,1834.38 1023.97,1982.63 1049.21,2007.87 C161.2@1049.21,2034.68 C161.2@1049.21,2040.79 ; C167.2@1587.74,3918.45 1587.74,4002.51 1603.68,4018.45 1608.68,4023.45 1618.68,4033.45 v2(1623.68,4038.45) 1628.68,4033.45 1638.68,4023.45 1643.68,4018.45 1704.63,3957.51 1704.63,3933.45 C165.2@1704.63,3918.45 ; 1623.68,4268.45 U16.3@1623.68,4423.45 ; 1733.68,1893.45 1788.68,1838.45 U14.3@1888.68,1838.45 2058.68,1838.45 ; 1738.68,1783.45 1793.68,1838.45 ; 1743.68,2168.45 1813.68,2238.45 C158.2@1998.03,2238.45 ; C160.2@2098.68,1798.45 2058.68,1838.45 ; C160.2@2118.68,1838.45 2058.68,1838.45 ; 2118.68,1863.45 2123.68,1858.45 ; C160.2@2123.96,1794.36 2123.68,1794.67 2123.68,1960.48 2149.79,1986.59 C157.2@2167.1,1986.6 ; C159.2@2377.74,1353.45 C159.2@2381.67,1353.45 v2(2458.68,1353.45) v2(2488.68,1353.45) v2(2518.68,1353.45) v2(2548.68,1353.45) v2@2573.68,1353.45 ; C146.1@4520.08,1074.45 C146.1@4522.05,1074.45 4613.68,1074.45 4619.68,1074.45 ; NT1.2@4830.8,1051.22 v2(4906.45,1051.22) ; v4@5905.51,4528.27 J15.5@5905.51,4738.98
  Bottom Layer w78.74: C3.2@2094.41,4176.89 2094.41,4409.45 2094.41,4602.44
  Bottom Layer w100: v2@1623.68,4041.78 1623.68,4053.45 v2(1623.68,4068.45) 1623.68,4083.45 v2(1623.68,4098.45) 1623.68,4178.18 1623.68,4268.45 ; 3098.97,2103.16 3133.68,2103.16 C137.2@3224.59,2103.18
  Bottom Layer w150: J1.3@9892.52,6078.74 10010.63,6196.85 J1.2@10089.37,6196.85 10198.68,6196.85 10238.68,6196.85 10278.68,6196.85 10318.68,6196.85 10358.68,6196.85 10398.68,6196.85 10438.68,6196.85 10478.68,6196.85 10542.91,6196.85 J3.2@10739.76,6196.85 J3.2@10752.08,6196.85 ; J3.3@10542.91,6078.74 10542.91,6143.45 10542.91,6196.08
  other v1: 677.17,102.36 10031,113 10555,113 3488.19,129.92 8468.5,129.92 9086.61,129.92 6354.33,133.86 7318.9,133.86 4448.82,141.73 5228.35,141.73 5881.89,141.73 9590.55,141.73 4007.87,145.67 6846.46,145.67 7866.14,145.67 2877.95,149.61 10031,159.54 10555,159.54 10031,202 10555,202 165.35,354.33 11586.61,492.13 2720.47,622.05 6377.95,716.54 6086.61,724.41 6898,755 3748.03,771.65 6437.01,992.13 11633.86,1023.62 1602.36,1078.74 1102.36,1086.61 2570.87,1090.55 2929.13,1094.49 5237,1100 2102.36,1102.36 6122.05,1102.36 6433.07,1125.98 3559.06,1137.8 3870.08,1145.67 6127.1,1237.6 157.48,1287.4 6216.54,1330.71 2708.66,1362.2 3389.76,1370.08 5311.02,1417.32 8488.19,1535.43 11700.79,1559.06 3381.89,1669.29 5988.19,1783.46 4244.09,1972.44 4484.25,1976.38 5988.19,2027.56 11708.66,2181.1 9244.09,2212.6 10889,2222 393.7,2299.21 736.22,2429.13 169.29,2448.82 9248.03,2460.63 6665.35,2598.43 7562.99,2610.24 11704.72,2625.98 417.32,2728.35 8606.3,2732.28 10704.72,2763.78 4590.55,2771.65 7094.49,2803.15 6507.87,2814.96 8868.5,2902.4 6830.71,2937.01 11551.18,2960.63 7271.65,2972.44 9445,3070 6015.75,3185.04 3582.68,3188.98 3791.34,3188.98 1162,3221 11708.66,3291.34 2380,3322 1575,3382 6444.88,3413.39 10767.72,3488.19 2127,3498 6169.29,3543.31 5366.14,3633.86 5836,3645 6283.46,3688.98 5657.48,3700.79 8267.72,3775.59 1393.7,3779.53 8645.67,3807.09 11712.6,3811.02 9444.5,3819 11000,3870.08 7784,3873 153.54,3874.02 3864,3904 8764.4,3908.6 3516,3912 9451.7,3932 2051.18,3972.44 11157.48,3984.25 3125.98,3992.13 3259.84,3992.13 1283.46,4090.55 1732.28,4090.55 1527.56,4094.49 9023.62,4218.11 4827.1,4224.3 5960.63,4240.16 8391,4242 5377.95,4244.09 6594.49,4244.09 11586.61,4251.97 9468.9,4288.3 125.98,4346.46 4681,4371 7372,4541 3103,4605 6251.97,4669.29 11598.43,4688.98 10807.09,4704.72 759.84,4799.21 6295.28,4960.63 9124,5139 9239,5140 6221,5153 129.92,5181.1 10559.06,5322.83 7665.35,5417.32 6226.3,5487.2 5110.24,5515.75 8248.03,5618.11 129.92,5807.09 8437.01,5909.45 5046.11,5913.39 11629.92,6019.69 5446.33,6032 5500.86,6032 5555.39,6032 5609.92,6032 5664.44,6032 5718.97,6032 5773.5,6032 5827.01,6032 6817.55,6032.98 6872.08,6032.98 6926.6,6032.98 6981.13,6032.98 7035.66,6032.98 7090.19,6032.98 7144.71,6032.98 7198.23,6032.98 10909.45,6342.52 11267.72,6370.08 10035.43,6374.02 9622.05,6389.76 10472.44,6389.76 9263.78,6393.7 1877.41,6394.92 7921.26,6397.64 8933.07,6397.64 704.72,6405.51 8594.49,6405.51 1141.73,6409.45 1641.73,6409.45 8255.91,6409.45
  other v2: 2578.68,1353.45 8958.4,2928.7 9003.94,2929.13 6128.68,3083.45 1623.68,4008.45 1598.68,4023.45 1648.68,4023.45 1598.68,4053.45 1648.68,4053.45 1598.68,4083.45 1648.68,4083.45 5113.68,4223.45 7925.19,4948.97 7972.44,4948.97 8019.68,4948.97 8066.93,4948.97 8114.17,4948.97 7925.19,4996.21 7972.44,4996.21 8019.68,4996.21 8066.93,4996.21 8114.17,4996.21 7925.19,5043.45 7972.44,5043.45 8019.68,5043.45 8066.93,5043.45 8114.17,5043.45 7925.19,5090.7 7972.44,5090.7 8019.68,5090.7 8066.93,5090.7 8114.17,5090.7 9658,5115.38 9693,5115.38 9728,5115.38 7925.19,5137.94 7972.44,5137.94 8019.68,5137.94 8066.93,5137.94 8114.17,5137.94 9658,5150.38 9693,5150.38 9728,5150.38 7853.68,6243.45
  other v4: 4613.68,1058.45 4653.68,1058.45 4613.68,1113.45 4653.68,1113.45 3688.68,1303.45 3858.68,1508.45 3893.68,1508.45 3953.68,1508.45 3988.68,1508.45 3893.68,1548.45 3988.68,1548.45
  other v5: 9944.88,3326.77 10031.5,3326.77 9945.68,3366.45 10031.5,3366.14 9870.08,3401.58 9909.45,3401.58 10066.93,3401.58 10106.69,3401.58 9870.08,3488.19 9909.45,3488.19 10106.3,3488.19 9944.88,3523.62 10031.5,3523.62 9944.88,3562.99 10031.5,3562.99
  other v6: 5956.69,6252.8
  other v7: 10198.68,6143.45 10238.68,6143.45 10278.68,6143.45 10318.68,6143.45 10358.68,6143.45 10398.68,6143.45 10438.68,6143.45 10478.68,6143.45 10198.68,6248.45 10238.68,6248.45 10278.68,6248.45 10318.68,6248.45 10358.68,6248.45 10398.68,6248.45 10438.68,6248.45 10478.68,6248.45
  other v11: 8275.59,295.28 3088.68,2078.45 3133.68,2078.45 3088.68,2123.45 3133.68,2123.45
HJTAG#.HARD.TCK: HDR3.3 R287.2 | length 193.3
  Bottom Layer w5: HDR3.3@477.95,4281.1 538.58,4220.47 R287.2@646.14,4220.47
HJTAG#.HARD.TDI: HDR3.1 R284.2 | length 183.2
  Bottom Layer w5: HDR3.1@477.95,4381.1 539.02,4381.1 575.24,4417.32 R284.2@646.14,4417.32
HJTAG#.HARD.TDO: HDR3.2 R285.2 | length 324
  Bottom Layer w5: HDR3.2@377.95,4381.1 512.6,4515.75 R285.2@646.14,4515.75
HJTAG#.HARD.TMS: HDR3.4 R286.2 | length 293.6
  Bottom Layer w5: HDR3.4@377.95,4281.1 427.56,4330.71 547.24,4330.71 559.06,4318.9 R286.2@646.14,4318.9
HJTAG#.SOFT.TCK: HDR3.7 R295.2 | length 274.1
  Bottom Layer w5: HDR3.7@477.95,4081.1 542.54,4016.52 542.54,3945.91 563.25,3925.2 R295.2@646.14,3925.2
HJTAG#.SOFT.TDI: HDR3.5 R292.2 | length 192.6
  Bottom Layer w5: HDR3.5@477.95,4181.1 538.23,4181.1 597.28,4122.05 R292.2@646.14,4122.05
HJTAG#.SOFT.TDO: HDR3.6 R293.2 | length 351.2
  Bottom Layer w5: HDR3.6@377.95,4181.1 429.13,4129.92 510.23,4129.92 533.54,4106.61 533.54,4076.26 586.18,4023.62 R293.2@646.14,4023.62
HJTAG#.SOFT.TMS: HDR3.8 R294.2 | length 446.4
  Bottom Layer w5: HDR3.8@377.95,4081.1 427,4032.06 427,3907.65 507.88,3826.77 R294.2@646.14,3826.77
HJTAG.HARD.TCK: R283.1 R287.1 U5.B24 U7.H3 | length 11565.3
  Top Layer w5: U5.B24@10401.58,3897.64 10421.26,3917.32 10421.26,3952.76 10456.69,3988.19 10549.19,3988.19 v1(10617,4056) ; v1(10783.46,4350.39) 10874.02,4259.84 10929.13,4259.84 10960.63,4291.34 11110.24,4291.34 U7.H3@11125.98,4275.59
  MidLayer4 w5: v1(755.91,4220.47) 781.7,4220.47 821.68,4260.45 960.68,4260.45 979.76,4279.53 3477.68,4279.53 3513.11,4314.96 3888.46,4314.96 4038.07,4165.36 9299.44,4165.36 9433.3,4299.21 9446.54,4312.45 9918.68,4312.45 10110.68,4504.45 10467.15,4504.45 10582.68,4388.93 ; v1(10617,4056) 10531.5,4141.5 10531.5,4299.21 10582.68,4350.39 10582.68,4388.93 ; v1(10783.46,4350.39) 10736.86,4397 10590.75,4397 10582.68,4388.93
  Bottom Layer w11.81: R287.1@688.5,4220.47 R283.1@823.31,4220.47
HJTAG.HARD.TDI: R280.1 R284.1 U5.C1 | length 10502.4
  Top Layer w5: v1(9446.9,4263.8) 9444.88,4365.58 9430.7,4379.76 9147.46,4379.76 9140,4372.3 9140,3889.24 9159.24,3870 9286.14,3870 9303.62,3852.52 9470.63,3852.52 9476.38,3858.27 U5.C1@9496.06,3858.27
  MidLayer4 w5: v1(755.91,4417.32) 755.91,4366.14 732.28,4342.52 732.28,4204.73 744.09,4192.91 772.56,4192.91 824.1,4244.45 964.68,4244.45 987.94,4267.72 3482.57,4267.72 3518.01,4303.15 3883.57,4303.15 4033.17,4153.54 9304.34,4153.54 9391.87,4241.07 9414.59,4263.8 v1(9446.9,4263.8)
  Bottom Layer w11.81: R284.1@688.5,4417.32 R280.1@823.31,4417.32
HJTAG.HARD.TDO: R281.1 R285.1 U7.E6 | length 11127.2
  Top Layer w5: v1(10657.48,4452.76) 10657.48,4421.26 10673.23,4405.51 10791.34,4405.51 10870.08,4326.77 10992.13,4326.77 11019.69,4354.33 11204.72,4354.33 U7.E6@11220.47,4370.08
  MidLayer4 w5: v1(755.91,4515.75) 783.46,4488.19 783.46,4326.77 820.78,4289.45 954.68,4289.45 968.38,4303.15 3467.9,4303.15 3503.33,4338.58 3898.25,4338.58 4047.85,4188.98 9289.66,4188.98 9448.14,4347.45 9904.68,4347.45 10081.68,4524.45 10585.78,4524.45 v1(10657.48,4452.76)
  Bottom Layer w11.81: R285.1@688.5,4515.75 v1(755.91,4515.75) R281.1@823.31,4515.75
HJTAG.HARD.TMS: R282.1 R286.1 U5.A24 U7.E2 | length 11501.6
  Top Layer w5: U5.A24@10401.58,3937.01 10401.58,3956.69 10429.13,3984.25 v1(10429.13,4156.5) ; v1(10688.98,4433.07) 10799.21,4433.07 10846.46,4385.83 11078.74,4385.83 U7.E2@11094.49,4370.08
  MidLayer1 w5: v1(10429.13,4156.5) 10429.13,4341.83 10520.37,4433.07 v1(10688.98,4433.07)
  MidLayer4 w5: v1(755.91,4318.9) 800.64,4274.16 954.39,4274.16 971.57,4291.34 3472.79,4291.34 3508.22,4326.77 3893.35,4326.77 4042.96,4177.17 9294.55,4177.17 9439.84,4322.45 9905.68,4322.45 10097.68,4514.45 10549.74,4514.45 10646.28,4417.92 10673.82,4417.92 v1(10688.98,4433.07)
  Bottom Layer w11.81: R286.1@688.5,4318.9 v1(755.91,4318.9) R282.1@823.31,4318.9
HJTAG.SOFT.TCK: R291.1 R295.1 U5.H13 | length 10227.2
  Top Layer w7.87: v5@9948.82,3681.1 U5.H13@9968.5,3661.42
  MidLayer4 w5: v1(755.91,3925.2) 781.3,3925.2 838.66,3982.55 931.37,3982.55 982.29,4033.47 982.29,4202.07 1012.51,4232.28 3497.25,4232.28 3532.68,4267.72 3868.89,4267.72 4018.5,4118.11 9319.01,4118.11 9421.36,4220.45 9899.27,4220.45 9939.14,4180.59 9939.14,4123.86 9939.13,3902.37 9968.5,3873 9968.5,3700.79 v5@9948.82,3681.1
  Bottom Layer w11.81: R295.1@688.5,3925.2 v1(755.91,3925.2) R291.1@823.31,3925.2
  other v5: 9944.88,3681.1
HJTAG.SOFT.TDI: R288.1 R292.1 U5.F14 | length 10056.5
  Top Layer w7.87: U5.F14@10007.87,3740.16 v1(10027.56,3759.84)
  MidLayer4 w5: v1(755.91,4122.05) 863.28,4122.05 997.13,4255.91 3487.47,4255.91 3522.9,4291.34 3878.68,4291.34 4028.28,4141.73 9309.23,4141.73 9411.95,4244.45 9909.09,4244.45 9959.13,4194.41 9959.13,3910.65 10011.79,3858 10039.24,3858 10047.24,3850 10047.24,3779.53 v1(10027.56,3759.84)
  Bottom Layer w11.81: R292.1@688.5,4122.05 v1(755.91,4122.05) R288.1@823.31,4122.05
HJTAG.SOFT.TDO: R289.1 R293.1 U5.H14 | length 10157.9
  Top Layer w7.87: U5.H14@10007.87,3661.42 v5@10027.56,3681.1
  MidLayer4 w5: v1(755.91,4023.62) 785.24,4023.62 852.92,4091.3 911.47,4091.3 947.18,4127 947.18,4185.17 1006.1,4244.1 3492.36,4244.1 3527.79,4279.53 3873.78,4279.53 4023.39,4129.92 9314.12,4129.92 9418.65,4234.45 9899.41,4234.45 9949.13,4184.73 9949.13,3906.51 10007.87,3847.77 10007.87,3700.79 v5@10027.56,3681.1
  Bottom Layer w11.81: R293.1@688.5,4023.62 v1(755.91,4023.62) R289.1@823.31,4023.62
  other v5: 10031.5,3681.1
HJTAG.SOFT.TMS: R290.1 R294.1 U5.F13 | length 10164.9
  Top Layer w7.87: v1(9948.82,3759.84) U5.F13@9968.5,3740.16
  MidLayer4 w5: v1(755.91,3826.77) 831.98,3826.77 994.68,3989.48 994.68,4196 1019.16,4220.47 3502.14,4220.47 3537.58,4255.91 3864,4255.91 4013.61,4106.3 9323.91,4106.3 9423.06,4205.45 9900.13,4205.45 9929.13,4176.44 9929.13,4019.69 9929.13,4000 9929.13,3779.53 v1(9948.82,3759.84)
  Bottom Layer w11.81: R294.1@688.5,3826.77 v1(755.91,3826.77) R290.1@813.78,3826.77
HOST_DIN: U5.Y15 U7.H6 | length 3782.4
  Top Layer w5: v1(10787.4,4200.79) 10831.49,4156.7 11129.14,4156.7 11220.47,4248.03 U7.H6@11220.47,4275.59
  Top Layer w7.87: U5.Y15@10047.24,3188.98 v1(10066.93,3169.29)
  MidLayer4 w5: v1(10011,2588) 10055,2632 v1(10055,2732)
  MidLayer3 w5: v1(10011,2588) 9908,2588 9905,2591 9905,2637 9912,2644 10092,2644 10119,2671 10530.87,2671 10571.86,2711.99 10571.86,2786.86 10635,2850 10635,2950 10645,2960 10772.4,2960 10787.4,2975 v1(10787.4,4200.79) ; v1(10055,2732) 10109.29,2732 10184.82,2807.53 10184.82,2878.18 10086.74,2976.26 10086.74,3149.48 v1(10066.93,3169.29)
HOST_INIT: R52.2 U5.AC14 U7.A3 | length 3810.6
  Top Layer w5: v1(10933.07,4527.56) 10964.57,4527.56 10976.38,4539.37 11110.24,4539.37 11125.98,4523.62 U7.A3@11125.98,4496.06
  Top Layer w7.87: U5.AC14@10007.87,3070.87 v1(10027.56,3051.18)
  MidLayer1 w5: v1(9942,2620) 10011,2689 10011,2749.55 10015.75,2754.3 10015.75,2992.13 10007.87,3000 10007.87,3031.49 v1(10027.56,3051.18)
  MidLayer2 w5: v1(10680,4376) 10913,4376 10933.07,4396.07 v1(10933.07,4527.56)
  MidLayer3 w5: v1(9942,2620) 10093,2620 10134,2661 10535.02,2661 10622.05,2748.03 10822.83,2948.82 10822.83,4098.43 10850.39,4125.98 10857,4132.59 10857,4305.82 10933.07,4381.89 v1(10933.07,4527.56)
  Bottom Layer w5: R52.2@10641.64,4388.25 10667.75,4388.25 v1(10680,4376)
HOST_LED.L0: LED1.1 U5.Y6 | length 7289.9
  Top Layer w5: v2(5086.22,1972.44) LED1.1@5137.8,1972.44
  Top Layer w7.87: v1(9673.23,3169.29) U5.Y6@9692.91,3188.98
  MidLayer2 w5: v2(5086.22,1972.44) 4942.73,1828.95 4942.73,1182 4976.37,1148.36 5405.53,1148.36 5484.87,1227.7 6053.02,1227.7 6122.05,1296.73 v2(6122.05,1330.71)
  MidLayer4 w5: v2(6122.05,1330.71) 6157.48,1366.14 6157.48,1405.51 6145.89,1417.1 6145.89,1459.87 6323.82,1637.8 7543.31,1637.8 7858.27,1952.76 7858.27,2948.82 7929.13,3019.69 8191.49,3019.69 8447.4,3275.59 9235.24,3275.59 9361.23,3149.61 9413.39,3149.61 9433.07,3149.61 9653.54,3149.61 v1(9673.23,3169.29)
HOST_LED.L1: LED2.1 U5.W6 | length 7153.8
  Top Layer w5: v2(5086.22,1874.02) LED2.1@5137.8,1874.02
  Top Layer w7.87: v1(9673.23,3208.66) U5.W6@9692.91,3228.35
  MidLayer2 w5: v2(5086.22,1874.02) 4956.52,1744.32 4956.52,1209.97 5008.13,1158.36 5399.87,1158.36 5481.43,1239.92 6036.08,1239.92 6094.49,1298.33 v2(6094.49,1358.27)
  MidLayer4 w5: v2(6094.49,1358.27) 6129.92,1358.27 6145.67,1374.02 6145.67,1401.58 6133.86,1413.39 6133.86,1463.58 6319.88,1649.61 7539.37,1649.61 7846.46,1956.69 7846.46,2952.76 7925.2,3031.5 8186.6,3031.5 8442.51,3287.4 9237.58,3287.4 9336,3188.98 9413.39,3188.98 9433.07,3188.98 9653.54,3188.98 v1(9673.23,3208.66)
HOST_LED.L2: LED3.1 U5.V6 | length 6995.1
  Top Layer w5: v2(5086.22,1775.59) LED3.1@5137.8,1775.59
  Top Layer w7.87: v1(9673.23,3248.03) U5.V6@9692.91,3267.72
  MidLayer2 w5: v2(5086.22,1775.59) 4970.31,1659.68 4970.31,1218.25 5016.41,1172.15 5393.38,1172.15 5477.69,1256.47 6022.29,1256.47 6070.68,1304.86 6070.68,1370.45 6086.06,1385.83 v2(6122.05,1385.83)
  MidLayer4 w5: v2(6122.05,1385.83) 6122.05,1467.52 6315.95,1661.42 7535.43,1661.42 7834.65,1960.63 7834.65,2956.69 7921.26,3043.31 8181.71,3043.31 8437.62,3299.21 9239.91,3299.21 9310.77,3228.35 9413.39,3228.35 9433.07,3228.35 9653.54,3228.35 v1(9673.23,3248.03)
HOST_LED.L3: LED4.1 U5.U6 | length 6832.3
  Top Layer w5: v2(5086.22,1677.17) LED4.1@5137.8,1677.17
  Top Layer w7.87: v1(9673.23,3287.4) U5.U6@9692.91,3307.09
  MidLayer2 w5: v2(5086.22,1677.17) 4991.19,1582.14 4991.19,1228.89 5032.56,1187.52 5388.74,1187.52 5504.97,1303.75 6040.41,1303.75 6054.2,1317.54 6054.2,1373.1 v2(6094.49,1413.39)
  MidLayer4 w5: v2(6094.49,1413.39) 6094.49,1455.71 6312.01,1673.23 7531.5,1673.23 7822.83,1964.57 7822.83,2960.63 7917.32,3055.12 8176.82,3055.12 8432.72,3311.02 9242.24,3311.02 9309.17,3244.1 9413.39,3244.1 9433.07,3244.1 9519.69,3244.1 9543.31,3267.72 9653.54,3267.72 v1(9673.23,3287.4)
HOST_LED.L4: LED5.1 U5.T6 | length 6726.3
  Top Layer w5: v2(5086.22,1578.74) LED5.1@5137.8,1578.74 ; v2@5098.43,1578.74 LED5.1@5133.86,1578.74
  Top Layer w7.87: v1(9673.23,3326.77) U5.T6@9692.91,3346.46
  MidLayer2 w5: v2(5086.22,1578.74) 5013.26,1505.78 5013.26,1245.43 5058.57,1200.12 5382.35,1200.12 5512.94,1330.71 v2(6031.5,1330.71)
  MidLayer4 w5: v2(6031.5,1330.71) 6066.93,1366.14 6066.93,1409.45 6062.99,1413.39 6062.99,1439.96 6308.07,1685.04 7527.56,1685.04 7811.02,1968.5 7811.02,2964.57 7913.39,3066.93 8171.93,3066.93 8427.83,3322.84 9244.57,3322.84 9300.4,3267 9381.17,3267 9433.07,3318.9 9492.13,3318.9 9503.94,3307.09 9653.54,3307.09 v1(9673.23,3326.77)